# Altium PCB SM619GEFDFST.PcbDoc (part 3 of 3)
Units mm, origin at the board's own origin, x right, y up, seen from the top; angles counter-clockwise.
Board outline 101.04 x 68 mm, 8 copper layers (Top Layer, GND, VCC3+CORE, Signal 1, +5V SATA, Middle Layer 1, GND (Mid8), Bottom Layer), stack 0.633 mm thick; 196 components, 107 nets, 647 pads, 641 vias.
Unrouted connection lines stored in the file: 30.
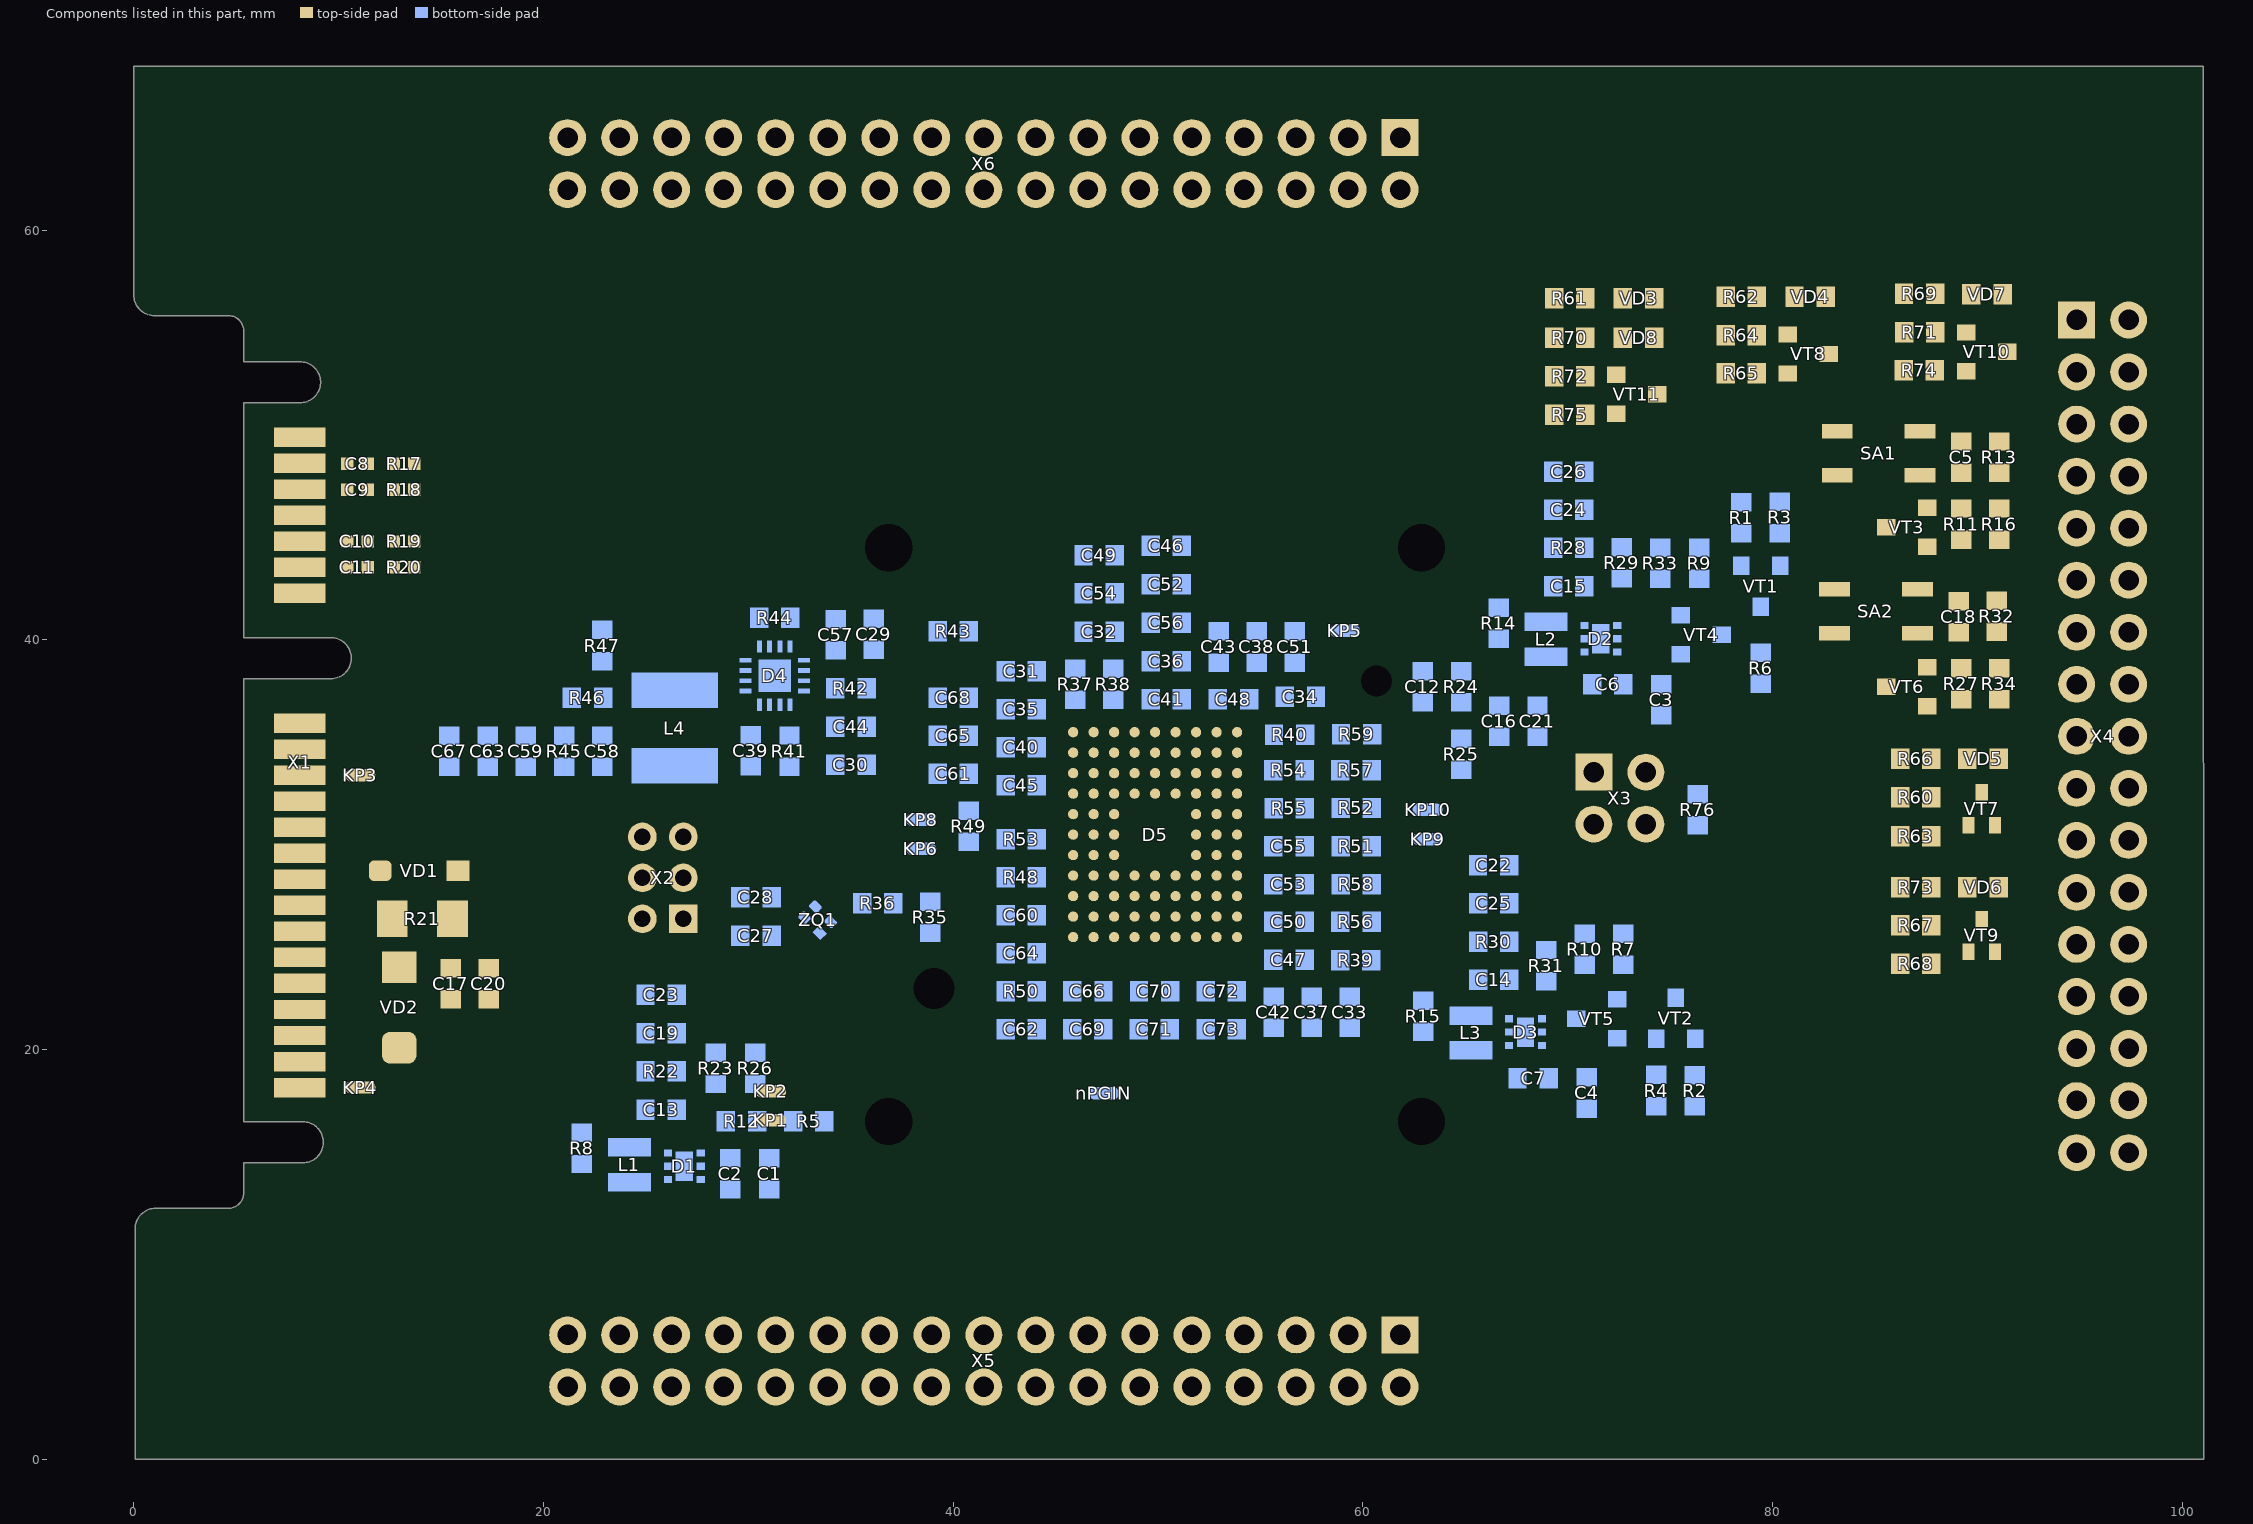
[diagram p9: the components of this part, seen from the top]

## Polygon pours and split planes (outlines as drawn) (continued)
NetKP3_1 on Top Layer "NONET_L-01_P-001" (solid, remove dead copper, pour order 125): 6.296,36.381 6.296,32.91 12.109,32.91 12.198,33 12.198,35.377 10.565,37.01 6.925,37.01 ccw(c6.925,36.381)
+3.3V_VCCAH on Top Layer "NONET_L-01_P-001" (solid, remove dead copper, pour order 108): 38.995,33.729 42.548,33.729 43.3,32.977 43.3,31.888 42.512,31.1 40.147,31.1 32.226,23.179 26.109,23.179 25.6,23.688 25.6,24.564 26.226,25.19 30.456,25.19
+1.5V_DRAM on Top Layer "NONET_L-01_P-001" (solid, remove dead copper, pour order 99): 61.19,25.96 61.19,24.352 61.733,23.808 63.753,23.808 64.945,22.616 75.646,22.616 76.1,23.07 76.1,25.4 75.54,25.96 67.79,25.96 66.145,27.605 62.835,27.605
+3.3V_FLCORE on Top Layer "NONET_L-01_P-001" (solid, remove dead copper, pour order 109): 29.4,33.544 29.4,32.3 28.8,31.7 15.213,31.7 14.623,32.29 14.623,33.564 15.124,34.065 28.879,34.065
+3.3V_FLCORE on Top Layer "NONET_L-01_P-001" (solid, remove dead copper, pour order 117): 78.26,56.14 76.137,56.14 75.675,56.602 75.675,58.993 75.974,59.292 77.733,59.292 78.26,58.765
+3.3V_VCC3 on Top Layer "NONET_L-01_P-001" (solid, remove dead copper, pour order 97): 85.953,23.694 86.678,23.694 86.678,24.69 81.69,24.69 79.9,22.9 79.9,21.5 80.8,20.6 85.35,20.6 85.783,21.033 85.783,23.522
+3.3V_VCC3 on Top Layer "NONET_L-01_P-001" (solid, remove dead copper, pour order 118): 86.163,29.921 86.861,29.921 86.861,30.919 83.075,30.919 82.84,30.682 82.85,28.874 83.074,28.65 85.75,28.65 86,28.9 86,29.758
+3.3V_VCC3 on Top Layer "NONET_L-01_P-001" (solid, remove dead copper, pour order 91): 89.895,41.655 89.895,43.475 90.04,43.62 92.155,43.62 92.297,43.478 92.297,41.597 92.079,41.379 90.171,41.379
+1.5V_DRAM on Top Layer "NONET_L-01_P-001" (solid, remove dead copper, pour order 119): 86.875,55.62 83.97,55.62 83.75,55.4 83.75,52.85 83.925,52.675 85.393,52.675 85.595,52.877 85.595,53.941 85.811,54.157 86.723,54.157 86.875,54.31
+3.3V_FLCORE on Top Layer "NONET_L-01_P-001" (solid, remove dead copper, pour order 120): 86.965,56.28 84.549,56.28 84.35,56.479 84.35,59.375 84.525,59.55 86.825,59.55 86.965,59.41
NetVD1_1 on Top Layer "NONET_L-01_P-001" (solid, remove dead copper, pour order 127): 11.575,27.75 13,27.75 13.25,28 13.25,30 13,30.25 9.806,30.25 9.694,30.138 9.694,29.025 9.448,28.779 6.325,28.779 6.325,25.291 10.791,25.291 11.065,25.565 11.065,27.24
NetR21_1 on Top Layer "NONET_L-01_P-001" (solid, remove dead copper, pour order 124): 13.55,29.918 13.55,28.075 13.875,27.75 14.311,27.314 14.311,25.502 14.623,25.19 16.979,25.19 17.25,25.461 17.25,29.875 16.875,30.25 13.882,30.25
no net on Top Solder "NONET_L-01_P-001" (solid): 76.035,44.003 cw(c76.508,44.003) 76.508,44.476 cw(c76.495,44.016) 76.955,44.003 cw(c76.528,43.986) 76.545,43.558 cw(c76.513,44.036)
no net on Top Solder "NONET_L-01_P-001" (solid): 19.731,58.341 cw(c20.203,58.341) 20.203,58.813 cw(c20.191,58.354) 20.651,58.341 cw(c20.223,58.323) 20.241,57.896 cw(c20.208,58.373)
+3.3V_VCCAH on Top Solder "NONET_L-01_P-001" (solid): 26.434,24.121 cw(c26.907,24.121) 26.907,24.594 cw(c26.894,24.134) 27.354,24.121 cw(c26.927,24.104) 26.944,23.676 cw(c26.912,24.154)
+1.8V_FLIO on Top Solder "NONET_L-01_P-001" (solid): 75.951,48.574 cw(c76.423,48.574) 76.423,49.046 cw(c76.411,48.586) 76.871,48.574 cw(c76.443,48.556) 76.461,48.129 cw(c76.428,48.606)
+1.5V_DRAM on Top Solder "NONET_L-01_P-001" (solid): 74.525,24.689 cw(c74.998,24.689) 74.998,25.161 cw(c74.985,24.701) 75.445,24.689 cw(c75.018,24.671) 75.035,24.244 cw(c75.002,24.721)
+1.1V_VCCK on Top Solder "NONET_L-01_P-001" (solid): 19.609,55.483 cw(c20.081,55.483) 20.081,55.955 cw(c20.069,55.495) 20.529,55.483 cw(c20.101,55.465) 20.119,55.038 cw(c20.086,55.515)
no net on Top Solder "NONET_L-01_P-001" (solid): 74.282,12.098 cw(c74.755,12.098) 74.755,12.571 cw(c74.742,12.111) 75.202,12.098 cw(c74.775,12.081) 74.792,11.653 cw(c74.76,12.131)
+3.3V_FLCORE on Top Solder "NONET_L-01_P-001" (solid): 19.727,32.896 cw(c20.199,32.896) 20.199,33.368 cw(c20.187,32.908) 20.647,32.896 cw(c20.219,32.878) 20.237,32.451 cw(c20.204,32.928)
+3.3V_VCC3 on Top Solder "NONET_L-01_P-001" (solid): 18.754,8.963 cw(c19.227,8.963) 19.227,9.436 cw(c19.214,8.976) 19.674,8.963 cw(c19.247,8.946) 19.264,8.518 cw(c19.232,8.996)
+1.1V_VP on Top Solder "NONET_L-01_P-001" (solid): 19.651,50.088 cw(c20.123,50.088) 20.123,50.56 cw(c20.111,50.101) 20.571,50.088 cw(c20.143,50.07) 20.161,49.643 cw(c20.128,50.12)
+3.3V_VCC3 on Top Solder "NONET_L-01_P-001" (solid): 82.1,22.87 cw(c82.1,22.397) 82.573,22.397 cw(c82.113,22.41) 82.1,21.95 cw(c82.083,22.377) 81.655,22.36 cw(c82.133,22.392)
+1.1V_CORE on Top Solder "NONET_L-01_P-001" (solid): 19.56,52.872 cw(c20.033,52.872) 20.033,53.344 cw(c20.02,52.884) 20.48,52.872 cw(c20.053,52.854) 20.07,52.427 cw(c20.038,52.904)
+1.5V_VDDQ on Top Solder "NONET_L-01_P-001" (solid): 74.351,16.858 cw(c74.824,16.858) 74.824,17.33 cw(c74.811,16.87) 75.271,16.858 cw(c74.844,16.84) 74.861,16.413 cw(c74.829,16.89)
+5V_SATA on Top Solder "NONET_L-01_P-001" (solid): 20.135,26.752 cw(c20.608,26.752) 20.608,27.225 cw(c20.595,26.765) 21.055,26.752 cw(c20.628,26.735) 20.645,26.307 cw(c20.613,26.785)
+1.8V_VCCFQ on +5V SATA "NONET_L-01_P-001" (solid, remove dead copper, pour order 73): 44.927,33.665 50.687,39.425 56.425,39.425 56.7,39.15 56.7,31.79 56.252,31.342 49.127,31.342 46.883,29.097 46.883,28.668 46.655,28.44 45.147,28.44 44.927,28.66
+1.5V_DRAM on +5V SATA "NONET_L-01_P-001" (solid, remove dead copper, pour order 70): 69.812,40.96 69.812,28.822 67.95,26.96 67.95,23.774 66.756,22.58 63.805,22.58 60.135,22.58 59.675,23.04 59.675,25.01 60.265,25.6 62.196,27.531 62.196,48.871 65.262,51.937 78.262,51.937 81.779,55.454 87.896,55.454 88.562,54.788 88.562,47.987 87.675,47.1 75.952,47.1
+3.3V_FLCORE on +5V SATA "NONET_L-01_P-001" (solid, remove dead copper, pour order 68): 13.956,45.331 13.956,32.869 14.829,31.996 28.557,31.996 28.826,32.265 28.842,41.549 33.852,46.55 38.24,46.55 40.676,44.115 40.676,39.676 37.751,36.752 37.751,25.751 32.724,20.723 29.698,20.723 28.675,19.7 28.675,14.25 28.925,14 45.583,14 46.716,15.132 46.716,23.106 43.776,26.062 43.776,36.842 45.934,39 48.191,39 48.576,39.385 48.576,48.003 53.231,52.65 76.88,52.65 80.23,56 87.875,56 88.562,56.687 88.562,59.888 88.2,60.25 28.875,60.25
+5V_SATA on +5V SATA "Middle Layer 3-+5V_SATA" (solid, remove dead copper, pour order 72): 11.55,27.525 11.55,10.775 14.497,7.827 73.402,7.827 75.325,9.75 75.325,16.304 81.601,22.58 82.684,23.663 82.684,44.716 81.419,45.981 75.964,45.981 72.375,42.392 72.375,37.371 72.622,37.124 74.79,37.124 75.276,36.638 75.276,29.736 73.765,28.225 70.525,28.225 70.154,27.854 70.154,26.519 68.888,25.253 68.888,17.002 64.361,12.475 26.41,12.475 23.781,15.053 23.781,22.798 24.383,23.4 34.004,23.4 36.955,26.351 36.955,33.47 36.955,37.238 40.357,40.64 40.357,42.341 40.103,42.595 38.318,42.595 37.949,42.226 35.869,42.226 35.499,42.595 31.417,42.595 30.2,41.378 30.2,30.816 28.909,29.525 13.55,29.525
+1.8V_FLIO on Signal 1 "NONET_L-01_P-001" (solid, pour order 131): 56.95,34.639 57.375,34.213 59.133,34.213 59.762,34.843 59.762,36.802 59.225,37.339 59.225,46.469 62.756,50 68.55,50 68.875,50.325 68.875,53.95 68.55,54.275 63.325,54.275 56.95,47.9
PWR_GD on Signal 1 "NONET_L-01_P-001" (solid, remove dead copper, pour order 74): 30.256,16.378 33.603,16.378 34.825,17.6 34.825,22.62 34.825,39.835 32.6,42.06 22.635,42.06 21.25,40.675 21.25,36.625 21.986,35.889 28.486,35.889 29.19,35.185 29.19,17.444
+1.5V_VDDQ on Middle Layer 1 "NONET_L-01_P-001" (solid, remove dead copper, pour order 2): 62.099,20.046 57.19,20.046 51.872,25.364 51.26,25.364 49.725,26.9 49.725,34.196 50.089,34.56 51.535,34.56 51.945,34.15 51.945,30.681 52.076,30.55 55.908,30.55 56.093,30.365 56.093,28.963 57.237,28.963 62.535,23.665 62.535,20.482
+1.1V_VP on Middle Layer 1 "NONET_L-01_P-001" (solid, remove dead copper, pour order 0): 43.634,39.045 47.291,39.045 47.449,38.888 47.449,35.884 47.912,35.421 47.912,33.89 48.294,33.508 48.618,33.508 49.078,33.048 49.078,28.544 48.928,28.394 48.177,28.394 48.04,28.257 48.04,27.654 47.845,27.459 46.871,27.459 46.686,27.643 46.686,28.162 46.569,28.279 45.903,28.279 45.694,28.488 45.694,29.819 46.719,30.844 46.719,31.271 46.636,31.354 43.984,31.354 43.368,31.961 43.368,38.778
GND on GND "NONET_L-01_P-001" (solid, remove dead copper, pour order 129): 100,67 1.075,67 1.075,57.499 ccw(c1.825,57.499) 1.825,56.749 5.825,56.749 cw(c5.825,56.246) 6.328,56.246 6.328,54.996 ccw(c6.825,54.996) 6.825,54.499 9.575,54.499 cw(c9.575,53.999) 10.075,53.999 10.075,50.999 cw(c9.575,50.999) 9.575,50.499 6.825,50.499 ccw(c6.825,50.003) 6.328,50.002 6.328,41.746 ccw(c7.065,41.746) 7.065,41.009 11.115,41.009 cw(c11.115,40.549) 11.575,40.549 11.575,37.499 cw(c11.075,37.499) 11.075,36.999 6.825,36.999 ccw(c6.824,36.503) 6.328,36.502 6.328,18.02 ccw(c7.032,18.02) 7.032,17.316 9.578,17.316 cw(c9.578,16.59) 10.305,16.589 10.305,14.043 cw(c9.579,14.043) 9.578,13.316 6.828,13.316 ccw(c6.827,12.817) 6.328,12.816 6.328,11.816 cw(c5.582,11.815) 5.581,11.069 2.18,11.069 ccw(c2.25,9.896) 1.078,9.816 1.078,1 100,1

## Other copper
Top Layer:
  pour cut-out: 54.201,63.1 cw(c54.201,61.981) 54.201,60.861 cw(c54.201,61.981)
  pour cut-out: 56.741,63.1 cw(c56.741,61.981) 56.741,60.861 cw(c56.741,61.981)
  pour cut-out: 59.281,63.1 cw(c59.281,61.981) 59.281,60.861 cw(c59.281,61.981)
  pour cut-out: 61.821,63.1 cw(c61.821,61.981) 61.821,60.861 cw(c61.821,61.981)
  pour cut-out: 62.4,23.6 62.4,23.318 ccw(c62.718,23.318) 62.718,23 62.89,23
  pour cut-out: 42.254,28.416 42.254,28.917 cw(c42.531,28.917) 42.531,29.194 43.7,29.194
  pour cut-out: 54.347,36.33 45.54,36.33 ccw(c45.54,35.805) 45.015,35.805 45.015,24.816 ccw(c45.358,24.816) 45.358,24.474 54.453,24.474 ccw(c54.453,24.846) 54.825,24.846 54.825,35.853 ccw(c54.347,35.853)
  pour cut-out: 16.575,23.55 18.089,23.55 18.089,22.943 16.592,22.943 16.575,22.96
  pour cut-out: 14.725,23.55 16.239,23.55 16.239,22.943 14.742,22.943 14.725,22.96
  pour cut-out: 88.4,25.559 88.589,25.37 91.429,25.37 91.68,25.621 91.68,25.77 89.71,25.77 89.71,27.108 89.701,27.108 89.584,27.225 88.4,27.225
  pour cut-out: 87.1,34.9 87.1,33.5 86.934,33.446 86.934,34.954
  pour cut-out: 87.175,38.275 87.173,38.277 86.008,38.277 86.008,37.939 86.232,37.716 87.375,37.716
  pour cut-out: 88.475,38.4 88.208,38.4 88.153,38.345 88.153,37.654 88.454,37.654 88.5,37.7
  pour cut-out: 86.202,37.103 86.198,37.999 88.64,37.999 88.64,37.103
  pour cut-out: 88.446,38.334 89.959,38.334 89.959,37.7 88.5,37.7 88.454,37.654
  pour cut-out: 88.475,46.225 88.179,46.225 87.895,45.941 87.895,45.906 87.364,45.906 87.1,45.642 87.1,45.084 87.503,45.084 87.65,44.936 87.789,45.075 88.575,45.075
  pour cut-out: 86.202,46.1 86.202,44.9 87.176,44.9 87.194,44.882 87.475,45.163 87.475,46.1
  pour cut-out: 89.955,46.1 88.451,46.1 88.451,45.084 88.511,45.143 90.003,45.143 89.955,45.259
  pour cut-out: 90.805,53.45 90.803,53.448 88.899,53.448 88.584,53.764 88.936,54.116 88.936,54.464 90.877,54.464 90.954,54.541
  pour cut-out: 81.175,53.4 81.184,53.391 82.153,53.391 82.153,54.403 82.2,54.45 79.537,54.45 79.537,52.643 79.88,52.3 79.926,52.346 80.036,52.346 80.036,52.873 80.043,52.866 80.353,52.866 80.353,53.36 80.362,53.35 81.175,53.35
  pour cut-out: 50.726,49.816 50.726,50.257 50.688,50.296 50.577,50.185 50.28,50.185
  pour cut-out: 44.958,49.901 44.958,50.154 44.896,50.217 44.699,50.217
  pour cut-out: 76.304,23.081 76.377,16.473 75.805,15.9 75.248,15.9 75.753,16.076 76.137,16.473 76.137,21.369
  pour cut-out: 9.375,29.1 9.363,29.112 9.363,30.167 9.654,30.458 12.915,30.458 12.915,30.396 12.931,30.38 9.737,30.38 9.737,30.312 9.55,30.125 9.595,30.08 9.595,29.025
  pour cut-out: 14.35,25.25 17.063,25.25 17.156,25.156 17.073,25.073 14.512,25.073 14.5,25.085
  pour cut-out: 10.275,37.15 12.166,35.259 12.287,35.259 12.287,35.463 10.682,37.068 10.682,37.146
  pour cut-out: 12.1,32.603 12.1,35.655 12.402,35.353 12.402,32.82
  pour cut-out: 6.665,45.61 6.665,45.289 9.565,45.289 9.565,45.61
  pour cut-out: 6.875,40.823 6.825,40.773 6.75,40.847 6.124,40.847 6.124,50.944 6.281,51.1 6.875,51.1
  pour cut-out: 6.875,17.675 6.875,37.325 6.625,37.575 6.55,37.5 6.025,37.5 6.025,17.044 6.224,16.845 6.881,16.845
  pour cut-out: 9.743,24.027 9.743,22.428 6.11,22.428 6.11,24.027
  pour cut-out: 55.289,37.5 56.451,36.338 56.451,37.471 56.425,37.497
  pour cut-out: 39.453,40.233 39.582,40.362 39.767,40.362 39.127,41.002 39.13,40.775 39.02,40.666
  pour cut-out: 42.531,29.194 42.007,29.194 41.809,28.996 41.809,28.08 42.115,27.774 42.725,27.774 42.977,27.522 43.067,27.611 43.067,28.838 43.032,28.872
  pour cut-out: 57.308,35.666 57.308,35.054 57.312,35.05 57.938,35.05 57.938,35.572 57.847,35.663
  pour cut-out: 57.632,36.127 58.244,36.127 58.244,34.907 57.632,34.907
  pour cut-out: 6.328,25.29 6.328,24.969 11.221,24.969 11.221,25.29
  pour cut-out: 6.665,43.065 6.665,42.744 9.565,42.744 9.565,43.065
  pour cut-out: 6.665,46.88 6.665,46.559 9.565,46.559 9.565,46.88
  pour cut-out: 6.665,49.42 6.665,49.099 9.565,49.099 9.565,49.42
  pour cut-out: 6.31,32.91 6.31,32.589 12.402,32.589 12.402,32.91
  pour cut-out: 6.328,29.1 6.328,28.779 9.694,28.779 9.694,29.1
  pour cut-out: 23.838,29.169 23.941,29.272 25.697,29.272 25.925,29.5 25.925,31.279 26.025,31.379 27.765,31.379 27.852,31.292 27.852,25.357 27.794,25.299 24.019,25.299 23.838,25.479
  pour cut-out: 70.015,34.699 70.015,29.833 70.121,29.727 72.289,29.727 72.45,29.889 72.45,34.677 72.317,34.811 70.124,34.811
  pour cut-out: 6.3,21.475 6.31,21.485 9.75,21.485 9.75,19.415 11.614,19.415 11.614,18.971 9.481,18.971 9.448,19.004 9.448,21.26 6.159,21.26
  pour cut-out: 10.283,16.933 11.853,16.933 12.259,17.339 12.259,18.783 11.624,19.418 11.565,19.006 11.773,19.002 12.062,18.712 12.062,17.629 11.679,17.246 10.596,17.246
  pour cut-out: 86.943,41.871 87.197,41.871 87.197,42.13 87.228,42.161 87.194,42.195 86.81,42.195
  pour cut-out: 86.943,43.079 87.197,43.079 87.186,43.068 87.186,42.8 86.91,42.8 86.894,42.784
  pour cut-out: 88.85,54.3 90.795,54.3 90.911,54.416 90.838,54.49 89.091,54.49 89.026,54.425 88.895,54.425
  pour cut-out: 88.575,52.45 89.004,52.44 89.004,54.812 88.66,54.487 88.508,54.487
  pour cut-out: 87.073,49.571 87.327,49.571 87.346,49.59 87.346,49.903 87.025,49.903 87.017,49.895
  pour cut-out: 87.073,50.779 87.327,50.779 87.327,50.449 87.312,50.464 87.045,50.464
  pour cut-out: 73.345,57.37 73.399,57.424 73.511,57.424 73.511,55.916 73.337,55.916
  pour cut-out: 57.381,31.564 56.805,31.564 56.805,31.017
  pour cut-out: 62.939,39.739 63.753,39.739 63.753,39.602
  pour cut-out: 62.647,39.446 62.647,38.61 62.827,38.61
  pour cut-out: 66.503,47.388 65.541,47.388 65.541,46.577
  pour cut-out: 85.014,26.05 85.014,24.707 85.545,24.707
  pour cut-out: 85.203,26.333 85.58,26.333 85.58,26.76
  pour cut-out: 85.2,28.525 85.595,28.525 85.595,28.197
  pour cut-out: 88.3,25.675 88.3,25.252 88.701,25.252
  pour cut-out: 89.575,27.225 89.793,27.225 89.793,27.036
  pour cut-out: 88.325,31.825 88.325,31.504 88.575,31.504
  pour cut-out: 89.55,33.575 89.798,33.575 89.798,33.315
  pour cut-out: 91.65,38 91.65,38.334 91.95,38.334
  pour cut-out: 90.2,37.7 90.455,37.7 90.455,37.87
  pour cut-out: 88.05,37.3 88.3,37.3 88.3,37.506
  pour cut-out: 89.5,42.525 89.775,42.525 89.775,42.8
  pour cut-out: 91.85,41.225 91.595,41.225 91.595,40.982
  pour cut-out: 88.147,40.847 88.425,40.847 88.425,41.04
  pour cut-out: 56.028,61.257 56.425,61.257 56.425,60.746
  pour cut-out: 57.245,61.097 56.675,61.097 56.675,60.675
  pour cut-out: 62.83,61.97 62.83,61.186 62.389,61.186
  pour cut-out: 61.821,60.961 62.605,60.961 62.605,61.186
  pour cut-out: 94.841,39.361 94.128,39.361 94.128,39.757
  pour cut-out: 93.832,40.37 93.832,39.6 94.15,39.6
  pour cut-out: 94.841,43.919 93.75,43.919 93.75,43.7
  pour cut-out: 93.832,42.91 93.832,43.875 94.075,43.875
  pour cut-out: 91.625,45.825 91.625,46.075 92.025,46.075
  pour cut-out: 88.15,44.075 88.15,44.31 88.385,44.31
  pour cut-out: 90.175,45.5 90.48,45.5 90.48,45.752
  pour cut-out: 88.3,45.075 88.585,45.075 88.585,45.368
  pour cut-out: 88.2,48.425 88.568,48.425 88.568,48.813
  pour cut-out: 89.775,50.3 90.033,50.3 90.033,50.625
  pour cut-out: 70.05,52.225 70.275,52.225 70.275,52.03
  pour cut-out: 71.425,52.175 71.425,52.366 71.779,52.366
  pour cut-out: 73.575,52.4 73.807,52.4 73.807,52.162
  pour cut-out: 74.95,52.4 74.95,52.653 75.293,52.653
  pour cut-out: 78.425,57.675 78.425,57.37 78.686,57.37
  pour cut-out: 83.887,55.97 84.206,55.97 84.206,56.26
  pour cut-out: 83.15,56.25 83.15,55.97 83.428,55.97
  pour cut-out: 87.1,57.85 87.1,57.525 87.475,57.525
  pour cut-out: 90.575,54.45 90.869,54.45 90.869,54.12
  pour cut-out: 83.25,53.4 83.606,53.4 83.606,53.005
  pour cut-out: 66.176,57.624 65.541,57.624 65.541,58.1
  pour cut-out: 73.9,21.925 73.9,22.564 73.457,22.564
  pour cut-out: 44.75,29.125 45.116,29.125 45.116,29.434
  pour cut-out: 44.8,34.225 45.067,34.225 45.067,33.964
  pour cut-out: 70.7,26.4 70.7,26.113 70.275,26.113
  pour cut-out: 73.025,26.5 73.025,26.113 73.407,26.113
  pour cut-out: 86.855,33.01 86.855,31.637 87.275,31.637 87.275,33.01
  pour cut-out: 88.997,33.5 88.333,33.5 88.333,33.668
  pour cut-out: 62.151,23.6 62.424,23.6 62.424,23.196
  pour cut-out: 11.691,49.09 12.342,49.09 12.342,48.643
  pour cut-out: 10.141,49.09 9.448,49.09 9.448,48.518
  pour cut-out: 10.049,46.83 9.448,46.83 9.448,47.391
  pour cut-out: 12.248,46.83 11.575,46.83 11.575,47.197
  pour cut-out: 11.725,45.3 12.342,45.3 12.342,45.037
  pour cut-out: 10.025,45.3 9.448,45.3 9.448,45.157
  pour cut-out: 11.773,43.04 12.267,43.04 12.267,43.365
  pour cut-out: 10.053,43.04 9.448,43.04 9.448,43.326
  pour cut-out: 85.626,52.396 87.275,52.396 87.275,52.45
  pour cut-out: 89.205,31.55 88.292,31.55 88.292,31.637
  pour cut-out: 75.115,55.44 75.471,55.44 75.471,55.8
  pour cut-out: 92.105,54.65 92.105,57.56 91.754,57.56
  pour cut-out: 36.294,39.287 36.366,39.358 36.703,39.358
  pour cut-out: 35.882,39.675 36.054,39.847 36.054,40.149
  pour cut-out: 92.154,49.358 92.154,47.51 91.581,47.51
  pour cut-out: 86.202,38.303 86.202,39.497 85.842,39.497
  pour cut-out: 90.519,31.947 91.68,31.947 91.68,33.636
  pour cut-out: 91.359,30.553 91.359,28.491 90.797,28.491
  pour cut-out: 16.015,22.583 16.875,22.583 16.875,23.012
  pour cut-out: 71.4,57.36 72.124,57.36 72.124,57.158
  pour cut-out: 91.875,56.418 91.875,54.575 91.345,54.575
  pour cut-out: 89.7,49.225 88.454,49.225 88.454,48.559
  pour cut-out: 88.06,48.575 88.575,48.575 88.575,48.415
  pour cut-out: 88.117,45.15 88.575,45.15 88.575,45.075
  pour cut-out: 89.826,45.54 90.455,45.54 90.455,45.189
  pour cut-out: 91.755,44.24 88.15,44.24 88.15,44.502
  pour cut-out: 91.049,23.844 91.049,24.17 91.36,24.17
  pour cut-out: 90.635,25.77 91.68,25.77 91.68,27.32
  pour cut-out: 88.153,36.153 91.755,36.153 91.755,36.588
  pour cut-out: 88.568,37.75 88.202,37.75 88.202,37.263
  pour cut-out: 89.849,37.75 90.425,37.75 90.425,37.654
  pour cut-out: 91.645,39.757 91.645,39.71 91.545,39.71
  pour cut-out: 91.646,39.71 86.22,39.71 86.22,40.36
  pour cut-out: 87.95,40.875 88.425,40.875 88.425,40.632
  pour cut-out: 88.341,41.244 88.341,40.632 88.508,40.632
  pour cut-out: 86.675,28.375 86.675,27.165 89.905,27.165
  pour cut-out: 85.701,52.396 83.559,52.396 83.559,52.787
  pour cut-out: 78.414,52.246 78.414,52.3 78.58,52.3
  pour cut-out: 76.644,52.572 77.006,52.572 77.006,52.246
  pour cut-out: 89.126,25.37 88.275,25.37 88.275,25.135
  pour cut-out: 85.58,25.431 85.58,24.79 85.32,24.79
  pour cut-out: 85.75,28.446 87.218,28.446 87.218,29.042
  pour cut-out: 90.38,28.62 89.905,28.62 89.905,29.296
  pour cut-out: 88.953,27.22 88.328,27.22 88.328,27.32
  pour cut-out: 89.71,26.97 89.71,27.32 89.826,27.32
  pour cut-out: 85.595,31.74 85.595,31 85.215,31
  pour cut-out: 88.383,34.9 88.93,34.9 88.93,34.786
  pour cut-out: 89.711,33.11 89.711,33.519 89.886,33.519
  pour cut-out: 89.849,47.51 90.425,47.51 90.425,47.656
  pour cut-out: 88.15,47.475 88.15,47.51 88.505,47.51
  pour cut-out: 88.825,54.4 88.575,54.4 88.575,54.238
  pour cut-out: 88.575,53.85 88.575,54.39 88.292,54.39
  pour cut-out: 86.723,53.953 87.65,53.953 87.65,54.123
  pour cut-out: 90.054,54.4 90.928,54.4 90.928,54.52
  pour cut-out: 89.097,57.56 88.585,57.56 88.585,57.58
  pour cut-out: 83.24,56.04 84.288,56.04 84.288,55.832
  pour cut-out: 83.322,53.35 83.606,53.35 83.606,53.466
  pour cut-out: 79.832,57.44 80.5,57.44 80.5,57.36
  pour cut-out: 81.62,57.439 82.04,57.439 82.04,56.14 81.62,56.14
  pour cut-out: 80.156,54.3 79.703,54.3 79.703,54.39
  pour cut-out: 79.88,53.7 79.88,54.31 79.726,54.31
  pour cut-out: 78.58,53.7 78.58,54.371 78.65,54.371
  pour cut-out: 81.325,54.3 82.275,54.3 82.275,54.481
  pour cut-out: 73.665,55.44 73.245,55.44 73.245,55.34
  pour cut-out: 73.345,56.04 73.345,55.371 73.15,55.371
  pour cut-out: 72.846,52.33 73.807,52.33 73.807,52.531
  pour cut-out: 70.215,51.69 70.215,52.25 70.402,52.25
  pour cut-out: 71.515,52.33 71.515,51.6 71.4,51.6
  pour cut-out: 71.856,52.33 71.425,52.33 71.425,52.531
  pour cut-out: 75.454,52.572 74.993,52.572 74.993,52.733
  pour cut-out: 74.816,55.44 75.225,55.44 75.225,55.377
  pour cut-out: 86.52,22.863 85.875,22.863 85.875,22.291
  pour cut-out: 86.85,28.925 86.191,28.925 86.12,28.996
  pour cut-out: 86.144,28.756 86.43,29.042 86.43,29.236
  pour cut-out: 10.219,16.587 10.219,17.104 10.791,17.104
  pour cut-out: 10.791,25.087 11.221,25.087 11.221,24.796
  pour cut-out: 44.862,37.853 44.862,38.433 45.324,38.433
  pour cut-out: 46.169,39.358 46.169,38.668 45.965,38.668
  pour cut-out: 62.705,23 64.209,23 64.209,23.199
  pour cut-out: 60.432,23.716 60.986,23.76 61.049,24.428
  pour cut-out: 45.772,24.063 45.772,23.885 45.91,23.885
  pour cut-out: 45.775,24.338 45.775,24.474 45.93,24.474
  pour cut-out: 45.793,23.814 45.793,24.497 45.492,24.497
  pour cut-out: 11.575,37.5 11.575,36.25 11.353,36.25
  pour cut-out: 44.507,29.194 45.095,29.194 45.095,28.796
  pour cut-out: 89.89,25.37 90.54,25.37 90.54,25.1
  pour cut-out: 89.978,31.547 90.538,31.547 90.538,31.397
  pour cut-out: 89.691,41.655 89.691,40.91 89.895,40.91
  pour cut-out: 89.946,49.13 89.946,48.71 89.705,48.71
  pour cut-out: 87.169,56.28 87.169,55.62 86.875,55.62
  pour cut-out: 84.148,56.517 84.148,55.698 84.45,55.698
  pour cut-out: 78.47,56.14 78.47,55.524 78.17,55.524
  pour cut-out: 75.471,56.602 75.471,55.544 75.824,55.544
  pour cut-out: 42.56,23.16 42.988,23.16 42.988,23.345
  pour cut-out: 42.443,22.572 42.906,22.572 42.906,22.357
  pour cut-out: 42.443,28.134 42.942,28.134 42.942,27.749
  pour cut-out: 63.146,39.673 63.146,39.34 63.471,39.34
  pour cut-out: 62.714,39.24 63.028,39.24 63.028,38.923
  pour cut-out: 63.25,23.24 63.25,23.716 63.12,23.716
  pour cut-out: 38.283,40.362 38.106,39.753 37.86,39.998
  pour cut-out: 37.895,40.683 37.329,40.567 37.537,40.326
  pour cut-out: 45.965,38.244 44.88,38.244 44.88,38.789
  pour cut-out: 67.699,20.048 68.211,20.048 68.285,20.122 68.285,21.59 68.191,21.684 67.701,21.684 67.615,21.598 67.615,20.132
  pour cut-out: 40.309,24.683 41.067,23.924 41.562,23.924 41.661,24.023 41.661,24.877 41.661,25.037 41.569,25.129 40.421,25.129 40.309,25.017
  pour cut-out: 39.806,30.024 39.675,30.024 39.675,30.497
  pour cut-out: 39.374,29.591 39.374,29.747 38.958,29.747
  pour cut-out: 45.169,38.892 44.754,38.892 44.754,39.06
  pour cut-out: 53.208,36.983 53.208,37.51 53.5,37.51
  pour cut-out: 52.642,36.983 52.642,37.523 52.424,37.523
  pour cut-out: 18.397,57.649 18.397,55.83 19.067,56.5
  pour cut-out: 18.398,55.021 18.398,53.275 19.223,54.1
  pour cut-out: 18.395,52.413 18.395,50.333 19.2,51.1
  pour cut-out: 72.64,53.43 74.215,53.43 74.215,54.271
  pour cut-out: 70.524,27.851 70.524,26.113 73.075,26.113 73.075,27.89 72.931,28.034 70.707,28.034
  pour cut-out: 59.211,33.64 59.211,34.627 58.871,34.287
  pour cut-out: 58.175,33.6 58.175,33.334 58.905,33.334
  pour cut-out: 59.231,28.08 59.231,27.309 58.941,27.309
  pour cut-out: 58.106,27.86 58.106,28.386 58.925,28.386
  pour cut-out: 32.75,15.723 34.01,15.723 34.179,15.554 34.179,14.309 33.997,14.128 32.724,14.128 32.55,14.301 32.55,15.522
  pour cut-out: 17.907,27.704 17.308,27.704 17.308,27.339
  pour cut-out: 12.931,30.454 13.952,30.454 13.439,29.75
  pour cut-out: 10.025,45.2 10.025,43.14 14.105,43.14 14.105,45.2
  pour cut-out: 14.105,48.99 14.105,46.93 10.025,46.93 10.025,48.99
  pour cut-out: 73.245,55.34 73.665,55.34 73.665,54.14 73.245,54.14
  pour cut-out: 69.845,53.466 70.265,53.466 70.265,52.167 69.845,52.167
  pour cut-out: 69.845,55.34 70.265,55.34 70.265,54.14 69.845,54.14
  pour cut-out: 69.895,57.36 70.315,57.36 70.315,56.06 69.895,56.06
  pour cut-out: 78.26,55.471 78.68,55.471 78.68,54.171 78.26,54.171
  pour cut-out: 78.26,57.44 78.68,57.44 78.68,56.14 78.26,56.14
  pour cut-out: 90.255,57.557 90.675,57.557 90.675,56.26 90.255,56.26
  pour cut-out: 86.965,57.578 87.385,57.578 87.385,56.28 86.965,56.28
  pour cut-out: 86.975,55.62 87.395,55.62 87.395,54.42 86.975,54.42
  pour cut-out: 90.042,49.13 91.752,49.13 91.752,48.415 90.042,48.415
  pour cut-out: 90.356,45.86 91.75,45.86 91.75,45.44 90.356,45.44
  pour cut-out: 89.695,41.36 91.633,41.36 91.633,40.94 89.695,40.94
  pour cut-out: 90.355,38.07 91.754,38.07 91.754,37.65 90.355,37.65
  pour cut-out: 90.635,33.6 90.635,32.91 91.03,32.91
  pour cut-out: 90.083,34.898 90.083,33.499 90.503,33.499 90.503,34.898
  pour cut-out: 90.045,30.45 90.455,30.45 90.455,30.25
  pour cut-out: 86.865,31.12 87.285,31.12 87.285,29.92 86.865,29.92
  pour cut-out: 90.48,27.32 90.48,26.753 90.86,26.753
  pour cut-out: 90.06,28.52 90.48,28.52 90.48,27.32 90.06,27.32
  pour cut-out: 86.78,26.766 87.2,26.766 87.2,25.46 86.78,25.46
  pour cut-out: 86.67,24.79 87.335,24.79 87.335,23.716 86.67,23.716
Middle Layer 1:
  pour cut-out: 55.951,21.06 55.951,20.324 55.573,20.324
  pour cut-out: 55.762,21.343 54.839,21.343 54.839,21.64
  pour cut-out: 58.884,26.056 60.445,26.056 60.445,26.783
  pour cut-out: 59.111,26.056 59.111,26.774 59.841,26.774
  pour cut-out: 58.679,26.489 59.442,26.6 59.511,27.26
  pour cut-out: 58.679,26.396 58.679,27.963 59.715,27.963
  pour cut-out: 55.75,29.4 56.1,29.4 56.1,29.75
  pour cut-out: 54.361,29.422 57.775,29.422 57.775,29.23 54.361,29.284
  pour cut-out: 54.361,28.81 58.225,28.81 58.225,29.107 54.361,29.107
  pour cut-out: 56.07,30.684 56.07,29.375 56.35,29.375
  pour cut-out: 52.361,30.684 56.07,30.684 56.07,31.48
  pour cut-out: 52.055,34.254 52.055,30.684 52.361,30.684
  pour cut-out: 45.361,31.296 43.797,31.296 43.797,30.99
  pour cut-out: 45.361,31.296 46.361,31.296 46.361,30.99
  pour cut-out: 48.616,33.734 49.186,33.734 49.186,33.168
  pour cut-out: 48.361,33.684 49.186,33.684 49.186,34.146
  pour cut-out: 48.055,33.99 48.055,35.29 48.88,35.29
Signal 1:
  pour cut-out: 30.396,39.004 30.396,37.42 30.503,37.313 32.098,37.313 32.268,37.484 32.268,39.022 32.127,39.163 30.555,39.163
+5V SATA:
  pour cut-out: 24.835,27.274 ccw(c24.835,26.373) 24.835,25.473 ccw(c24.835,26.373)
  pour cut-out: 26.835,29.274 ccw(c26.835,28.373) 26.835,27.473 ccw(c26.835,28.373)
  pour cut-out: 24.835,29.274 ccw(c24.835,28.373) 24.835,27.473 ccw(c24.835,28.373)
  pour cut-out: 45.215,21.233 45.215,20.621 45.821,20.621 45.821,21.233
  pour cut-out: 45.215,23.16 45.215,22.549 45.225,22.559 45.821,22.559 45.821,23.171
  pour cut-out: 25.966,27.243 25.966,25.505 27.703,25.505 27.703,27.243
  pour cut-out: 45.965,38.856 45.965,38.774 46.037,38.774 45.974,38.856
  pour cut-out: 45.965,38.856 48.237,38.856 48.237,38.667
  pour cut-out: 47.825,38.896 48.361,38.896 48.361,39.1
  pour cut-out: 74.71,46.166 75.175,46.175 75.175,46.071
  pour cut-out: 28.824,12.744 28.9,13.55 28.325,13.55
  pour cut-out: 29.134,12.877 31.914,12.867 31.914,13.518
  pour cut-out: 27.203,22.964 26.467,22.964 26.467,22.815
  pour cut-out: 26.199,22.663 26.199,21.952 26.432,21.952
  pour cut-out: 47.244,29.273 47.742,29.273 47.742,29.475
  pour cut-out: 47.078,29.107 47.078,28.595 46.81,28.595
  pour cut-out: 39.886,39.027 39.886,39.657 39.485,39.657
  pour cut-out: 30.351,32.454 30.052,32.454 30.052,32.107
  pour cut-out: 30.351,32.886 29.98,32.886 29.98,33.25
  pour cut-out: 27.588,30.243 27.588,31.107 27.929,31.107
  pour cut-out: 25.397,30.275 26.432,30.275 26.432,31.258
  pour cut-out: 24.056,30.26 24.056,31.234 23.6,31.234
  pour cut-out: 31.034,12.867 31.85,12.867 31.85,13.113
  pour cut-out: 31.29,13.066 31.29,13.725 31.596,13.725
  pour cut-out: 30.775,13.084 30.775,13.725 30.441,13.725
  pour cut-out: 29.417,13.152 29.417,13.626 29.766,13.626
  pour cut-out: 36.074,14.216 36.074,13.9 36.421,13.9
  pour cut-out: 35.509,14.216 35.509,13.9 35.124,13.9
  pour cut-out: 59.511,23.931 59.511,22.48 60.724,22.48
  pour cut-out: 68.766,53.873 68.505,53.873 68.501,52.575 69.995,52.575
  pour cut-out: 62.94,46.492 61.736,46.492 61.736,47.296
  pour cut-out: 26.947,15.059 25.565,15.059 25.565,15.904
  pour cut-out: 71.473,37.937 71.473,36.67 72.3,36.67
  pour cut-out: 71.307,38.103 70.325,38.103 70.325,38.645
  pour cut-out: 69.194,26.536 69.194,27.2 69.01,27.2
  pour cut-out: 68.888,26.23 68.311,26.23 68.311,25.892
  pour cut-out: 30.514,37.351 32.089,37.351 32.185,37.447 32.185,39.072 32.105,39.153 30.506,39.153 30.41,39.056 30.41,37.455
  pour cut-out: 71.275,40.847 71.275,39.286 71.383,39.179 71.905,39.179 72.006,39.28 72.006,40.853 71.899,40.96 71.388,40.96
  pour cut-out: 77.71,53.3 77.769,52.885 79.176,53.3
  pour cut-out: 74.454,36.67 75.03,36.67 75.276,36.424 75.276,35.849
  pour cut-out: 82.984,28.982 83.825,28.982 83.825,28.587
  pour cut-out: 82.984,30.42 82.984,28.982 83.29,28.982
  pour cut-out: 83.825,31.075 83.825,30.703 83.173,30.703
  pour cut-out: 27.187,14.818 27.187,14 27.588,14
  pour cut-out: 26.875,15.075 26.875,14.589 26.022,14.589
  pour cut-out: 39.584,38.794 39.001,38.794 39.001,39.156
  pour cut-out: 43.224,39.733 43.327,39.63 44.968,39.63 45.035,39.563 45.035,39.147 45.126,39.056 45.595,39.056 45.682,39.143 45.682,40.712 45.573,40.822 43.318,40.822 43.224,40.727
  pour cut-out: 62.882,42.512 61.802,42.512 61.802,41.954
  pour cut-out: 74.41,45.92 74.41,45.444 74.354,45.444
  pour cut-out: 77.455,53.17 77.455,52.65 77.025,52.65
  pour cut-out: 66.127,53.873 66.127,52.65 65.62,52.65
  pour cut-out: 66.127,52.65 66.127,53.873 68.505,53.873 68.505,52.65
  pour cut-out: 31.85,12.6 31.85,13.626 31.341,13.626
  pour cut-out: 36.199,12.6 36.199,13.626 36.779,13.626
  pour cut-out: 28.824,13.626 28.824,12.744 28.968,12.6 36.199,12.6 36.199,13.626
GND:
  pour cut-out: 54.201,63.1 cw(c54.201,61.981) 54.201,60.861 cw(c54.201,61.981)
  pour cut-out: 61.821,63.1 cw(c61.821,61.981) 61.821,60.861 cw(c61.821,61.981)
  pour cut-out: 59.281,63.1 cw(c59.281,61.981) 59.281,60.861 cw(c59.281,61.981)
  pour cut-out: 56.741,63.1 cw(c56.741,61.981) 56.741,60.861 cw(c56.741,61.981)
  pour cut-out: 45.215,21.233 45.215,20.621 45.821,20.621 45.821,21.233
  pour cut-out: 45.215,23.16 45.215,22.549 45.225,22.559 45.821,22.559 45.821,23.171
  pour cut-out: 41.809,28.671 41.809,28.08 42.421,28.08 42.421,28.671
  pour cut-out: 70.015,34.699 70.015,29.833 70.121,29.727 72.289,29.727 72.45,29.889 72.45,34.677 72.317,34.811 70.124,34.811
  pour cut-out: 23.838,29.169 23.941,29.272 25.697,29.272 25.925,29.5 25.925,31.279 26.025,31.379 27.765,31.379 27.852,31.292 27.852,25.491 27.729,25.367 23.95,25.367 23.838,25.479
  pour cut-out: 84.212,55.337 84.212,52.967 84.385,52.794 85.669,52.794 85.881,53.006 85.881,55.32 85.726,55.475 84.35,55.475
  pour cut-out: 90.153,51.994 90.153,50.602 90.386,50.369 91.598,50.369 91.851,50.622 91.851,52.074 91.728,52.197 90.356,52.197
  pour cut-out: 90.032,42.343 92.018,42.343 92.158,42.483 92.158,43.492 92.044,43.606 90.041,43.606 89.899,43.464 89.899,42.476
  pour cut-out: 66.194,53.762 66.194,51.372 66.39,51.177 67.483,51.177 67.675,51.369 67.675,52.375 67.866,52.566 68.416,52.566 68.565,52.714 68.565,53.735 68.421,53.879 66.311,53.879
  pour cut-out: 73.384,39.97 73.384,38.304 73.996,38.304 73.996,39.97
  pour cut-out: 82.925,30.55 82.925,29.15 83.093,28.982 85.682,28.982 85.826,29.126 85.826,30.574 85.676,30.725 83.112,30.737
  pour cut-out: 83.494,23.815 83.494,22.345 83.598,22.24 85.527,22.24 85.631,22.345 85.631,24.384 85.519,24.496 84.175,24.496
  pour cut-out: 70.492,27.848 70.492,26.289 70.66,26.121 72.965,26.121 73.121,26.277 73.121,27.884 73.001,28.005 70.659,28.015
  pour cut-out: 61.509,25.696 63.541,25.892 63.541,26.8 63.086,27.061
  pour cut-out: 62.029,24.479 62.455,23.924 63.379,23.924 63.541,24.086 63.541,25.01
  pour cut-out: 63.451,25.676 62.574,25.676 62.574,24.972
  pour cut-out: 63.541,25.892 63.541,25.01 63.235,25.01
  pour cut-out: 61.442,25.363 62.029,25.363 62.029,24.479
  pour cut-out: 62.362,24.412 62.362,24.873 63.155,24.873
  pour cut-out: 43.2,40.707 43.2,39.725 43.368,39.557 44.844,39.557 45.107,39.1 45.594,39.1 45.7,39.206 45.7,40.692 45.545,40.847 43.34,40.847
  pour cut-out: 40.243,24.727 41.252,23.924 41.603,23.924 41.661,23.982 41.661,25.063 41.594,25.129 40.314,25.129 40.243,25.058
  pour cut-out: 31.643,15.481 31.643,14.28 31.823,14.099 34.099,14.099 34.267,14.267 34.267,15.471 34.038,15.701 31.861,15.7
VCC3+CORE:
  pour cut-out: 47.346,18.199 cw(c47.341,17.862) 47.336,17.524 cw(c47.341,17.862)
  pour cut-out: 39.596,30.147 cw(c39.591,29.81) 39.586,29.472 cw(c39.591,29.809)
  pour cut-out: 41.805,31.939 cw(c41.8,31.602) 41.795,31.264 cw(c41.8,31.602)
  pour cut-out: 42.581,33.239 cw(c42.576,32.902) 42.571,32.564 cw(c42.576,32.902)
  pour cut-out: 44.092,33.239 cw(c44.087,32.902) 44.082,32.564 cw(c44.087,32.902)
  pour cut-out: 51.171,41.174 cw(c51.166,40.837) 51.161,40.499 cw(c51.166,40.837)
  pour cut-out: 41.809,28.671 41.809,28.08 42.421,28.08 42.421,28.671
  pour cut-out: 23.838,31.246 23.971,31.379 27.765,31.379 27.852,31.292 27.852,25.491 27.729,25.367 23.95,25.367 23.838,25.479
  pour cut-out: 45.361,24.684 44.975,24.684 44.975,24.875
  pour cut-out: 45.667,24.99 45.667,25.48 45.412,25.48
  pour cut-out: 45.055,25.99 45.055,24.99 45.361,24.99
  pour cut-out: 48.055,26.99 48.055,26.648 48.174,26.648
  pour cut-out: 52.055,33.99 52.055,33.643 52.158,33.54
  pour cut-out: 52.361,34.296 52.718,34.296 52.808,34.206
  pour cut-out: 53.361,35.296 53.833,35.3 53.972,35.161
  pour cut-out: 53.055,34.99 53.055,34.634 53.3,34.389
  pour cut-out: 54.577,36.206 54.577,35.906 54.895,35.906
  pour cut-out: 54.055,35.99 54.055,35.596 54.213,35.596
  pour cut-out: 66.207,51.174 67.543,51.174 67.627,51.258 67.627,53.862 67.561,53.927 66.221,53.927 66.135,53.841 66.135,51.247
  pour cut-out: 30.75,44.494 29.769,44.517 29.769,44.825
  pour cut-out: 31.662,14.3 31.662,15.434 31.891,15.663 33.947,15.663 34.128,15.482 34.128,14.277 33.976,14.125 31.837,14.125
  pour cut-out: 39.307,29.691 39.469,29.691 39.469,29.333
  pour cut-out: 41.682,31.883 42.125,31.883 42.125,31.996
  pour cut-out: 41.516,31.717 41.516,31.325 41.4,31.325
  pour cut-out: 44.085,32.594 43.65,32.594 43.65,32.847
  pour cut-out: 44.391,32.9 44.391,33.296 44.15,33.296
  pour cut-out: 42.576,33.205 43.159,33.183 43.275,33.066
  pour cut-out: 42.269,32.9 42.366,32.803 42.366,32.296
  pour cut-out: 60.778,17.346 60.778,17.743 60.367,17.743
  pour cut-out: 64.84,17.235 64.84,17.765 65.255,17.765
  pour cut-out: 64.861,16.261 64.861,19.18 63.626,19.18
  pour cut-out: 60.755,16.294 60.755,18.872 62.04,18.872
  pour cut-out: 47.555,17.644 47.555,18.364 48.101,18.364
  pour cut-out: 47.123,17.644 47.123,18.364 46.478,18.364
  pour cut-out: 67.892,52.518 68.438,52.518 68.503,52.583 68.503,53.831 68.434,53.9 67.873,53.9 67.808,53.835 67.808,52.602
  pour cut-out: 32.669,12.606 34.007,12.606 34.128,12.727 34.128,13.604 33.976,13.756 32.681,13.756 32.55,13.625 32.55,12.725
  pour cut-out: 26.505,15.029 26.505,13.612 26.612,13.505 27.125,13.505 27.238,13.618 27.238,15.037 27.15,15.125 26.601,15.125
  pour cut-out: 31.05,44.74 31.05,45.616 30.58,46.086
  pour cut-out: 38.624,24.359 39.582,24.359 39.582,25.079
  pour cut-out: 38.383,21.702 39.579,21.702 39.579,20.911
  pour cut-out: 30.489,37.332 32.105,37.332 32.2,37.426 32.2,39.083 32.122,39.161 30.647,39.161 30.409,38.923 30.409,37.411
  pour cut-out: 39.53,30.108 40.14,30.108 40.14,29.808
  pour cut-out: 48.301,28.27 50.564,28.27 50.564,27.99
  pour cut-out: 45.35,26.3 47.825,26.3 47.825,25.73
  pour cut-out: 48.061,28.03 48.061,26.99 48.665,26.99
GND (Mid8):
  pour cut-out: 61.821,63.1 cw(c61.821,61.981) 61.821,60.861 cw(c61.821,61.981)
  pour cut-out: 59.281,63.1 cw(c59.281,61.981) 59.281,60.861 cw(c59.281,61.981)
  pour cut-out: 56.741,63.1 cw(c56.741,61.981) 56.741,60.861 cw(c56.741,61.981)
  pour cut-out: 54.201,63.1 cw(c54.201,61.981) 54.201,60.861 cw(c54.201,61.981)
  pour cut-out: 45.215,21.233 45.215,20.621 45.821,20.621 45.821,21.233
  pour cut-out: 45.215,23.16 45.215,22.549 45.225,22.559 45.821,22.559 45.821,23.171
  pour cut-out: 41.809,28.671 42.421,28.671 42.421,28.08 41.809,28.08
  pour cut-out: 57.308,35.666 57.308,35.054 57.935,35.054 57.935,35.547 57.817,35.665
  pour cut-out: 57.632,36.127 57.632,34.907 58.244,34.907 58.244,36.127
  pour cut-out: 70.015,34.699 70.015,29.833 70.121,29.727 72.289,29.727 72.45,29.889 72.45,34.677 72.317,34.811 70.124,34.811
  pour cut-out: 23.838,29.169 23.941,29.272 25.697,29.272 25.925,29.5 25.925,31.279 26.025,31.379 27.765,31.379 27.852,31.292 27.852,25.491 27.729,25.367 23.95,25.367 23.838,25.479
  pour cut-out: 61.442,25.363 62.029,25.363 62.029,24.479
  pour cut-out: 63.451,25.676 62.574,25.676 62.574,24.972
  pour cut-out: 83.494,23.815 83.494,22.345 83.598,22.24 85.527,22.24 85.631,22.345 85.631,24.384 85.519,24.496 84.175,24.496
  pour cut-out: 82.925,30.55 82.925,29.15 83.093,28.982 85.682,28.982 85.826,29.126 85.826,30.574 85.676,30.725 83.112,30.737
  pour cut-out: 70.492,27.848 70.492,26.289 70.66,26.121 72.965,26.121 73.121,26.277 73.121,27.884 73.001,28.005 70.659,28.015
  pour cut-out: 43.2,40.707 43.2,39.725 43.368,39.557 44.844,39.557 45.107,39.1 45.594,39.1 45.7,39.206 45.7,40.692 45.545,40.847 43.34,40.847
  pour cut-out: 40.243,24.727 41.252,23.924 41.603,23.924 41.661,23.982 41.661,25.063 41.594,25.129 40.314,25.129 40.243,25.058
  pour cut-out: 66.194,53.762 66.194,51.372 66.39,51.177 67.483,51.177 67.675,51.369 67.675,52.375 67.866,52.566 68.416,52.566 68.565,52.714 68.565,53.735 68.421,53.879 66.311,53.879
  pour cut-out: 90.153,51.994 90.153,50.602 90.386,50.369 91.598,50.369 91.851,50.622 91.851,52.074 91.728,52.197 90.356,52.197
  pour cut-out: 84.212,55.337 84.212,52.967 84.385,52.794 85.669,52.794 85.881,53.006 85.881,55.32 85.726,55.475 84.35,55.475
  pour cut-out: 73.384,39.97 73.384,38.304 73.996,38.304 73.996,39.97
  pour cut-out: 90.032,42.343 92.018,42.343 92.158,42.483 92.158,43.492 92.044,43.606 90.041,43.606 89.899,43.464 89.899,42.476
  pour cut-out: 61.509,25.696 63.541,25.892 63.541,26.8 63.086,27.061
  pour cut-out: 63.541,25.892 63.541,25.01 63.235,25.01
  pour cut-out: 62.362,24.412 62.362,24.873 63.155,24.873
  pour cut-out: 62.029,24.479 62.455,23.924 63.379,23.924 63.541,24.086 63.541,25.01
  pour cut-out: 31.643,15.481 31.643,14.28 31.823,14.099 34.099,14.099 34.267,14.267 34.267,15.471 34.038,15.701 31.861,15.7
Bottom Layer:
  pour cut-out: 50.769,35.99 50.769,36.213 50.892,36.337 50.854,36.375 50.568,36.375
  pour cut-out: 53.953,35.99 54.769,35.99 54.769,36.48 53.953,36.492
  pour cut-out: 30.489,26.735 30.435,26.681 30.323,26.681 30.323,26.857 30.489,26.857
  pour cut-out: 51.83,36.961 52.152,36.961 52.152,36.777 52.142,36.771
  pour cut-out: 52.2,39.8 52.2,39.592 52.321,39.592
  pour cut-out: 66.95,26.275 66.95,25.892 67.277,25.892
  pour cut-out: 67.225,30.05 66.954,30.05 66.954,29.842
  pour cut-out: 27.7,20.525 27.1,20.525 27.1,20.225
  pour cut-out: 28.375,13.975 28.375,13.7 31.788,13.7 31.788,14.025
Multi-Layer:
  pour cut-out: 62.861,18.48 cw(c62.861,16.48) 64.861,16.48 64.861,16.454 cw(c62.907,16.454) 62.907,14.5 62.745,14.5 cw(c62.745,16.49) 60.755,16.49 cw(c62.745,16.49) 62.745,18.48
  pour cut-out: 60.724,38.999 cw(c60.727,37.99) 61.736,37.99 61.736,37.989 cw(c60.699,37.989) 60.699,36.952 60.638,36.952 cw(c60.638,37.975) 59.614,37.975 59.614,37.989 cw(c60.624,37.989) 60.628,38.999
  pour cut-out: 40.486,23.042 40.486,22.981 cw(c39.047,22.981) 39.047,21.542 cw(c39.047,22.943) 37.646,22.943 37.646,23.032 cw(c39.026,23.032) 39.026,24.412 39.047,24.412 cw(c39.047,22.971)
  pour cut-out: 36.898,46.5 cw(c36.898,44.5) 38.898,44.5 38.898,44.474 cw(c36.944,44.474) 36.944,42.52 36.782,42.52 cw(c36.782,44.51) 34.792,44.51 cw(c36.782,44.51) 36.782,46.5
  pour cut-out: 62.917,46.492 cw(c62.917,44.492) 64.917,44.492 64.917,44.466 cw(c62.963,44.466) 62.963,42.512 62.801,42.512 cw(c62.801,44.502) 60.811,44.502 cw(c62.801,44.502) 62.801,46.492
  pour cut-out: 36.895,18.474 cw(c36.895,16.475) 38.895,16.475 38.895,16.448 cw(c36.941,16.448) 36.941,14.494 36.779,14.494 cw(c36.779,16.484) 34.789,16.484 cw(c36.779,16.484) 36.779,18.474
  pour cut-out: 35.256,44.512 cw(c36.861,44.512) 38.466,44.512 cw(c36.861,44.512) 36.861,42.907 cw(c36.861,44.512)
  pour cut-out: 61.252,44.468 cw(c62.857,44.468) 64.462,44.468 cw(c62.857,44.468) 62.857,42.863 cw(c62.857,44.468)

## Silkscreen, mask and mechanical layers (free items; w line width, h text height)
Top Overlay:
  circle w0.2: c76.513,44.019 r0.478
  circle w0.2: c20.19,58.347 r0.478
  circle w0.2: c26.883,24.134 r0.478
  circle w0.2: c76.428,48.589 r0.478
  circle w0.2: c75.002,24.704 r0.478
  circle w0.2: c20.069,55.489 r0.478
  circle w0.2: c74.76,12.114 r0.478
  circle w0.2: c20.176,32.908 r0.478
  circle w0.2: c19.203,8.975 r0.478
  circle w0.2: c82.116,22.392 r0.478
  circle w0.2: c20.02,52.878 r0.478
  circle w0.2: c74.829,16.873 r0.478
  circle w0.2: c20.1,50.1 r0.478
  circle w0.2: c20.6,26.769 r0.478
  region: 68.984,34.332 68.984,35.058 69.346,34.695
  region: 67,25.9 67,24.7 66.4,25.3
  region: 10.664,50.228 10.664,49.503 10.302,49.865
  region: 28.763,25.863 28.763,25.137 28.4,25.5
  region: 72.298,6.278 71.548,6.278 71.298,7.778 71.798,7.778
  region: 72.798,6.278 73.548,6.278 72.548,7.778 72.298,7.778
  region: 73.548,6.278 71.048,3.278 72.798,6.278
  region: 71.048,3.278 71.548,6.278 72.298,6.278
  lines w0.127: 20.578,25.7 20.578,26
  lines w0.2: 70.298,7.778 69.798,6.278 71.048,3.278 ; 71.798,7.778 72.298,6.278 71.048,3.278 ; 68.548,6.278 69.298,7.778 72.548,7.778 73.548,6.278 ; 68.548,6.278 71.048,3.278 ; 68.548,6.278 73.548,6.278 ; 71.048,3.278 73.548,6.278
  text "+1.1V PWR" at 78.284,58.46 h0.8
  text "+1.5V PWR" at 87.133,58.46 h0.8
  text "SATA DATA" at 1.501,58.1 h0.6
  text "+1.8V_VCCFQ" at 21.151,58.097 h0.6
  text "+3.3V PWR" at 61.276,56.292 h0.8
  text "+1.1V_VCCK" at 21.151,55.161 h0.6
  text "+1.8V PWR" at 61.362,54.4 h0.8
  text "+1.1V_CORE" at 21.151,52.628 h0.6
  text "SW RESET" at 82.396,50.4 h0.6
  text "+1.1V_VP" at 21.151,49.85 h0.6
  text "+1.8V_FLIO" at 73.776,46.93 h0.6
  text "HW RESET" at 80.801,42.754 h0.6
  text "GND" at 75.713,42.38 h0.6
  text "SM619GEFDFST (ZIF TFBGA-90)" at 34.8,36.051 h0.6 r90
  text "UART/ROM TX" at 69.346,35.324 h0.6
  text "+3.3V_FLCORE" at 16.851,34.15 h0.6
  text "BUSY" at 82.134,33.842 h0.8
  text "RX" at 68.5,33.2 h0.6
  text "GND" at 75.45,33.2 h0.6
  text "JTAG" at 24.735,31.95 h0.6
  text "+3.3V_SATA" at 9.901,31.65 h0.6
  text "TX" at 68.5,30.7 h0.6
  text "GND" at 75.45,30.7 h0.6
  text "GND" at 21.551,30.2 h0.6
  text "JTCK" at 28.276,30.2 h0.6
  text "JTDO" at 21.251,28.2 h0.6
  text "JTDI" at 28.25,28.2 h0.6
  text "LINK ACTIVE" at 74.829,26.58 h0.8
  text "JTMS" at 21.251,26.2 h0.6
  text "JRST" at 28.15,26.2 h0.6
  text "+5V_SATA" at 18.452,24.95 h0.6
  text "+1.5V_DRAM" at 71.96,23.05 h0.6
  text "+3.3V_VCCAH" at 23.734,22.45 h0.6
  text "+3.3V_VCC3" at 79.285,20.85 h0.6
  text "EN_1.1V" at 25.801,17.6 h0.6
  text "+12V_SATA" at 10.376,16.275 h0.6
  text "+3.3V" at 26.801,16.225 h0.6
  text "+1.5V_VDDQ" at 71.601,15.05 h0.6
  text "+3.3V_VCC3F" at 71.251,10.25 h0.6
  text "SATA POWER" at 1.501,9.4 h0.6
  text "+3.3V_VCC3" at 20.051,8.65 h0.6
  text "SSD" at 96.044,8.5 h0.8
  text "SM619GEFDFST" at 87.25,6.924 h1.6
  text "ИЛ1301ТО1/1" at 76.213,3.75 h4
Bottom Overlay:
  text "ИЛ1301ТО1/1" at 96.75,62.25 h4
  text "DEVSLP" at 61.449,41.48 h0.6
  text "nQE" at 66.39,31.397 h0.6
  text "nPGS" at 36.85,31.097 h0.6
  text "nWP" at 66.39,30.2 h0.6
  text "ENRLS" at 36.9,29.45 h0.6
Board:
  lines w0.127: 0,0 0,11.178 0.075,11.253 cw(c1.075,11.253) 1.075,12.253 4.625,12.253 ccw(c4.625,13.003) 5.375,13.003 5.375,14.473 8.262,14.473 ccw(c8.262,15.473) 8.262,16.473 5.375,16.473 5.375,38.103 9.629,38.103 ccw(c9.629,39.103) 9.629,40.103 5.375,40.103 5.375,51.573 8.125,51.573 ccw(c8.125,52.573) 8.125,53.573 5.375,53.573 5.375,55.073 ccw(c4.625,55.073) 4.625,55.823 1.011,55.823 cw(c1.011,56.823) 0.011,56.823 0.011,68 101,68 101,0 0,0

## Dimensions
101.012,68 to 101.05,0 on Mechanical 2
0.011,68.026 to 101.012,68 on Mechanical 2

## Text inside footprints (layer, text, board x,y; h text height)
D5: Top Overlay "A" at 58.4,25.075 h1; Top Overlay "B" at 58.45,26.05 h1; Top Overlay "C" at 58.4,27.061 h1; Top Overlay "D" at 58.45,28.225 h1; Top Overlay "E" at 58.45,29.2 h1; Top Overlay "F" at 58.5,30.1 h1; Top Overlay "G" at 58.4,31.136 h1; Top Overlay "H" at 58.475,32.175 h1; Top Overlay "J" at 58.498,33.211 h1; Top Overlay "K" at 58.5,34.242 h1; Top Overlay "L" at 58.5,35.577 h1; Top Overlay "1" at 53.625,19.35 h1; Top Overlay "2" at 52.674,19.35 h1; Top Overlay "3" at 51.675,19.361 h1; Top Overlay "7" at 47.675,19.361 h1; Top Overlay "8" at 46.65,19.361 h1; Top Overlay "9" at 45.675,19.361 h1; Top Overlay "4" at 50.65,19.35 h1; Top Overlay "5" at 49.675,19.361 h1; Top Overlay "6" at 48.65,19.361 h1